# Altium PCB MezzanineDCDC_R1.PcbDoc (part 2 of 3)
Units mm, origin at the board's own origin, x right, y up, seen from the top; angles counter-clockwise.
Board outline 70 x 70 mm, 4 copper layers (Top Layer, GND 1, Signal, Bottom Layer), stack 1.554 mm thick; 95 components, 53 nets, 436 pads, 382 vias.
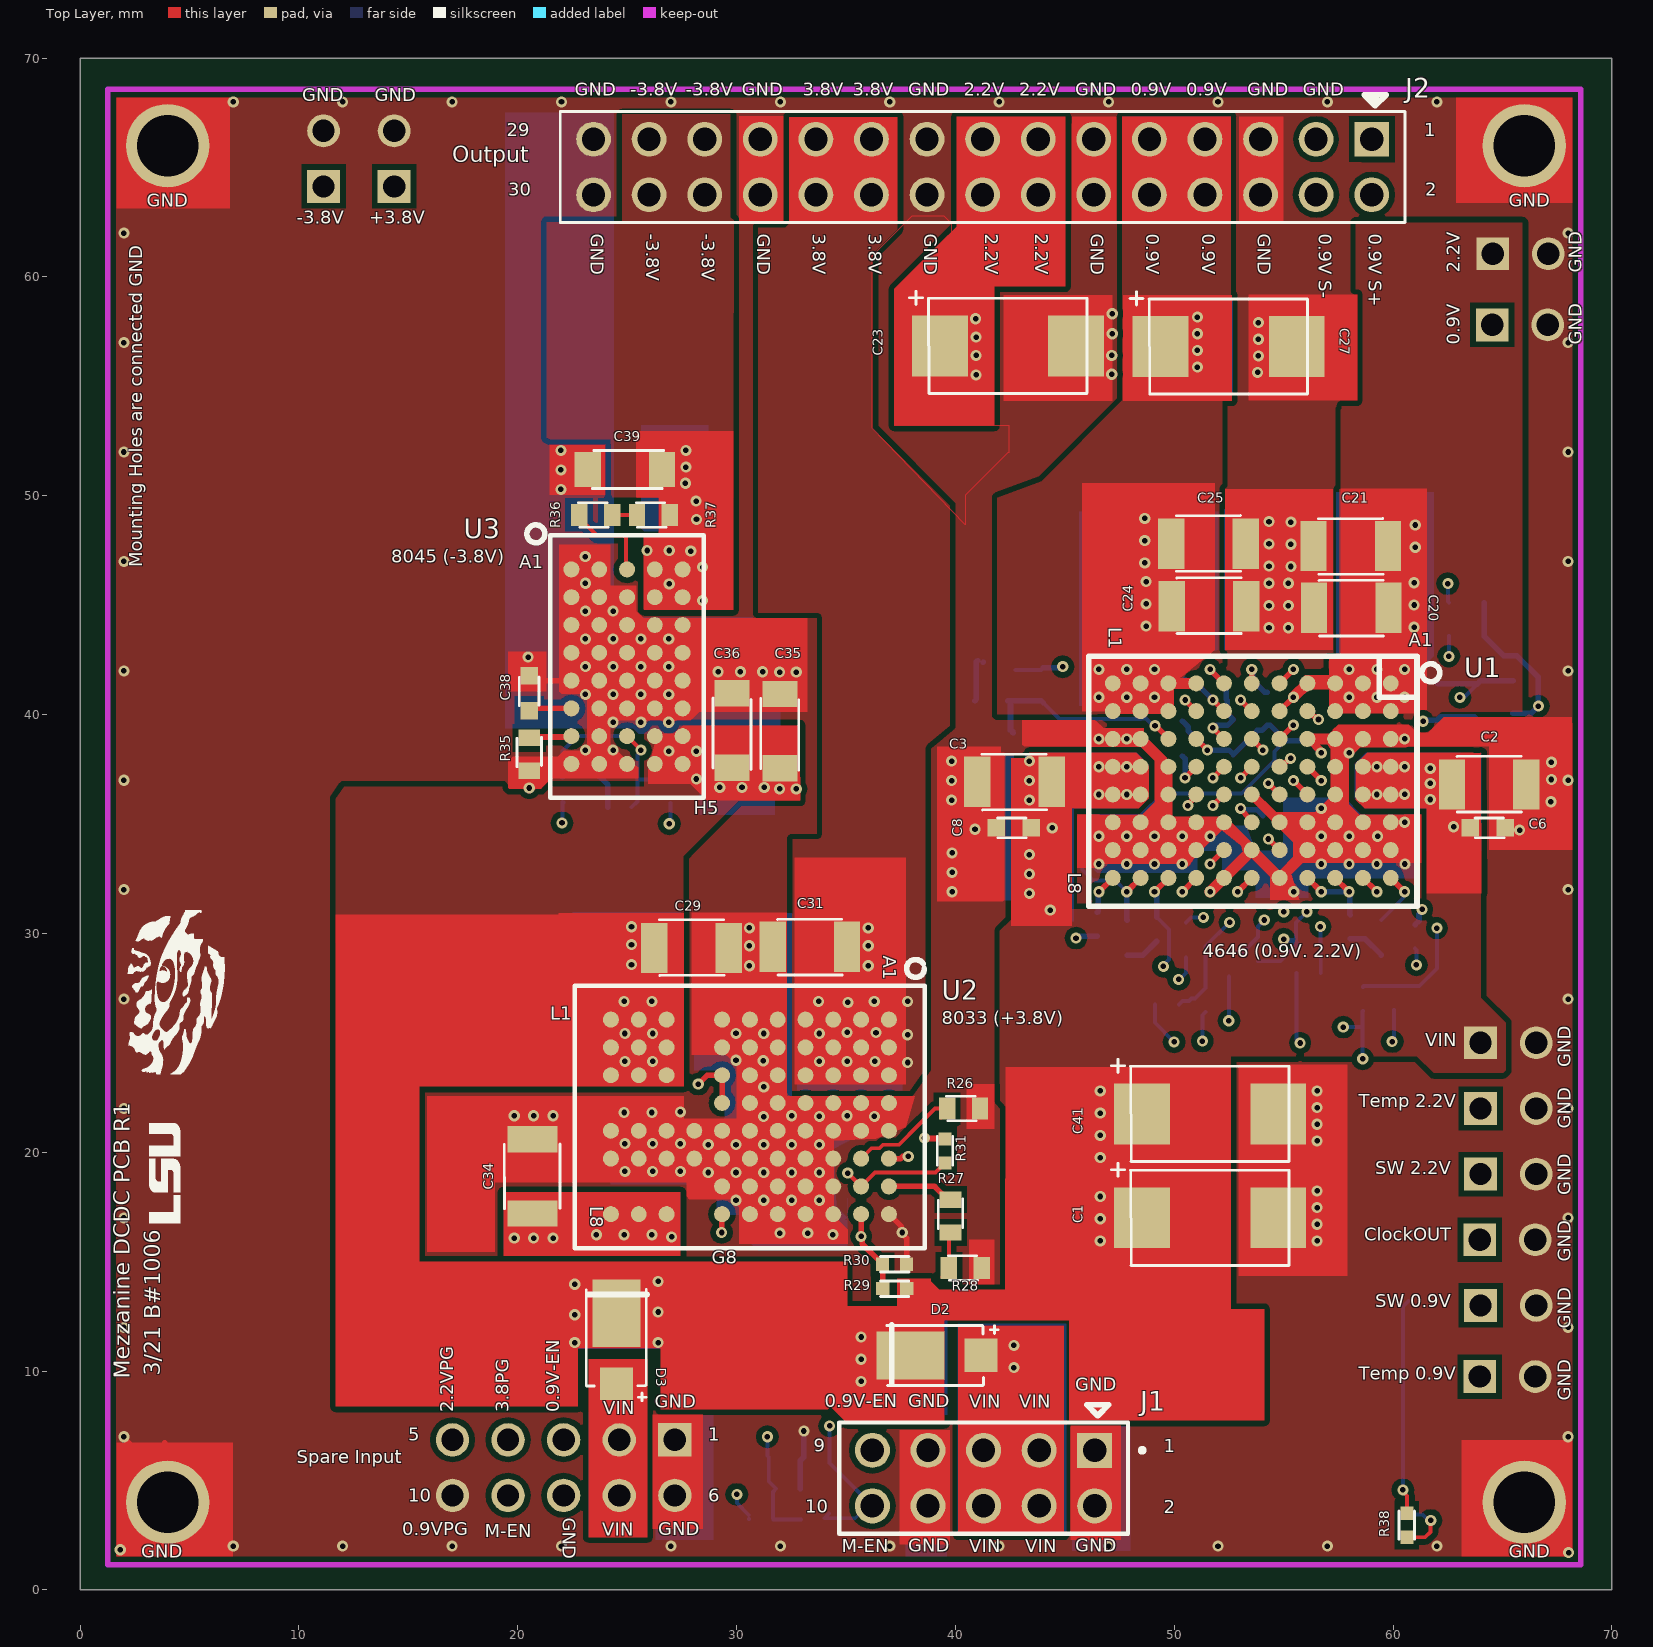
[diagram p0: Top Layer view]

## Via types
v1: diameter 0.508, hole 0.254, Top Layer to Bottom Layer, tented both sides, 382 vias

## Nets (pads, with @x,y where several pads share a name; then routed paths per layer and width w, separated by ;. In a path a pad name is that pad's centre, name@x,y a point inside that pad or via, vN(x,y) a via of type N, cw(c..) or ccw(c..) an arc to the next point about the centre after c; other vN are vias at no path point) (continued)
PGOOD1: (continued)
  Top Layer w0.254: v1(51.765,35.839) U1.G5@52.273,36.347
  Signal w0.178: v1(51.765,35.839) 51.765,35.242 52.25,34.758 52.25,34.305 52.354,34.201 52.923,34.201 54.356,32.768 54.356,30.81 v1@54.102,30.556
  Bottom Layer w0.178: R12.2@52.502,29.134 53.129,29.134 R11.1@53.823,29.827 53.823,30.322 v1(54.114,30.613)
PGOOD2: R13.1 R14.2 U1.E5 | length 11.3
  Top Layer w0.254: v1(54.305,36.855) U1.E5@54.813,36.347
  Signal w0.178: v1(54.305,36.855) 54.305,36.055 56.11,34.25 56.11,34.206 56.471,33.846 57.146,33.846 57.315,33.676 57.315,30.944 v1(56.679,30.308)
  Bottom Layer w0.178: v1(56.679,30.308) 56.679,29.536 56.693,29.523 R14.2@56.693,28.194